# Altium PCB GTV4.0-V16_Lite.PcbDoc (part 7 of 7)
Units mil, origin at the board's own origin, x right, y up, seen from the top; angles counter-clockwise.
Board outline 5582.68 x 4389.76 mil, 4 copper layers (Top Layer, Layer 1, Layer 2, Bottom Layer), stack 62.631 mil thick; 269 components, 191 nets, 849 pads, 375 vias.
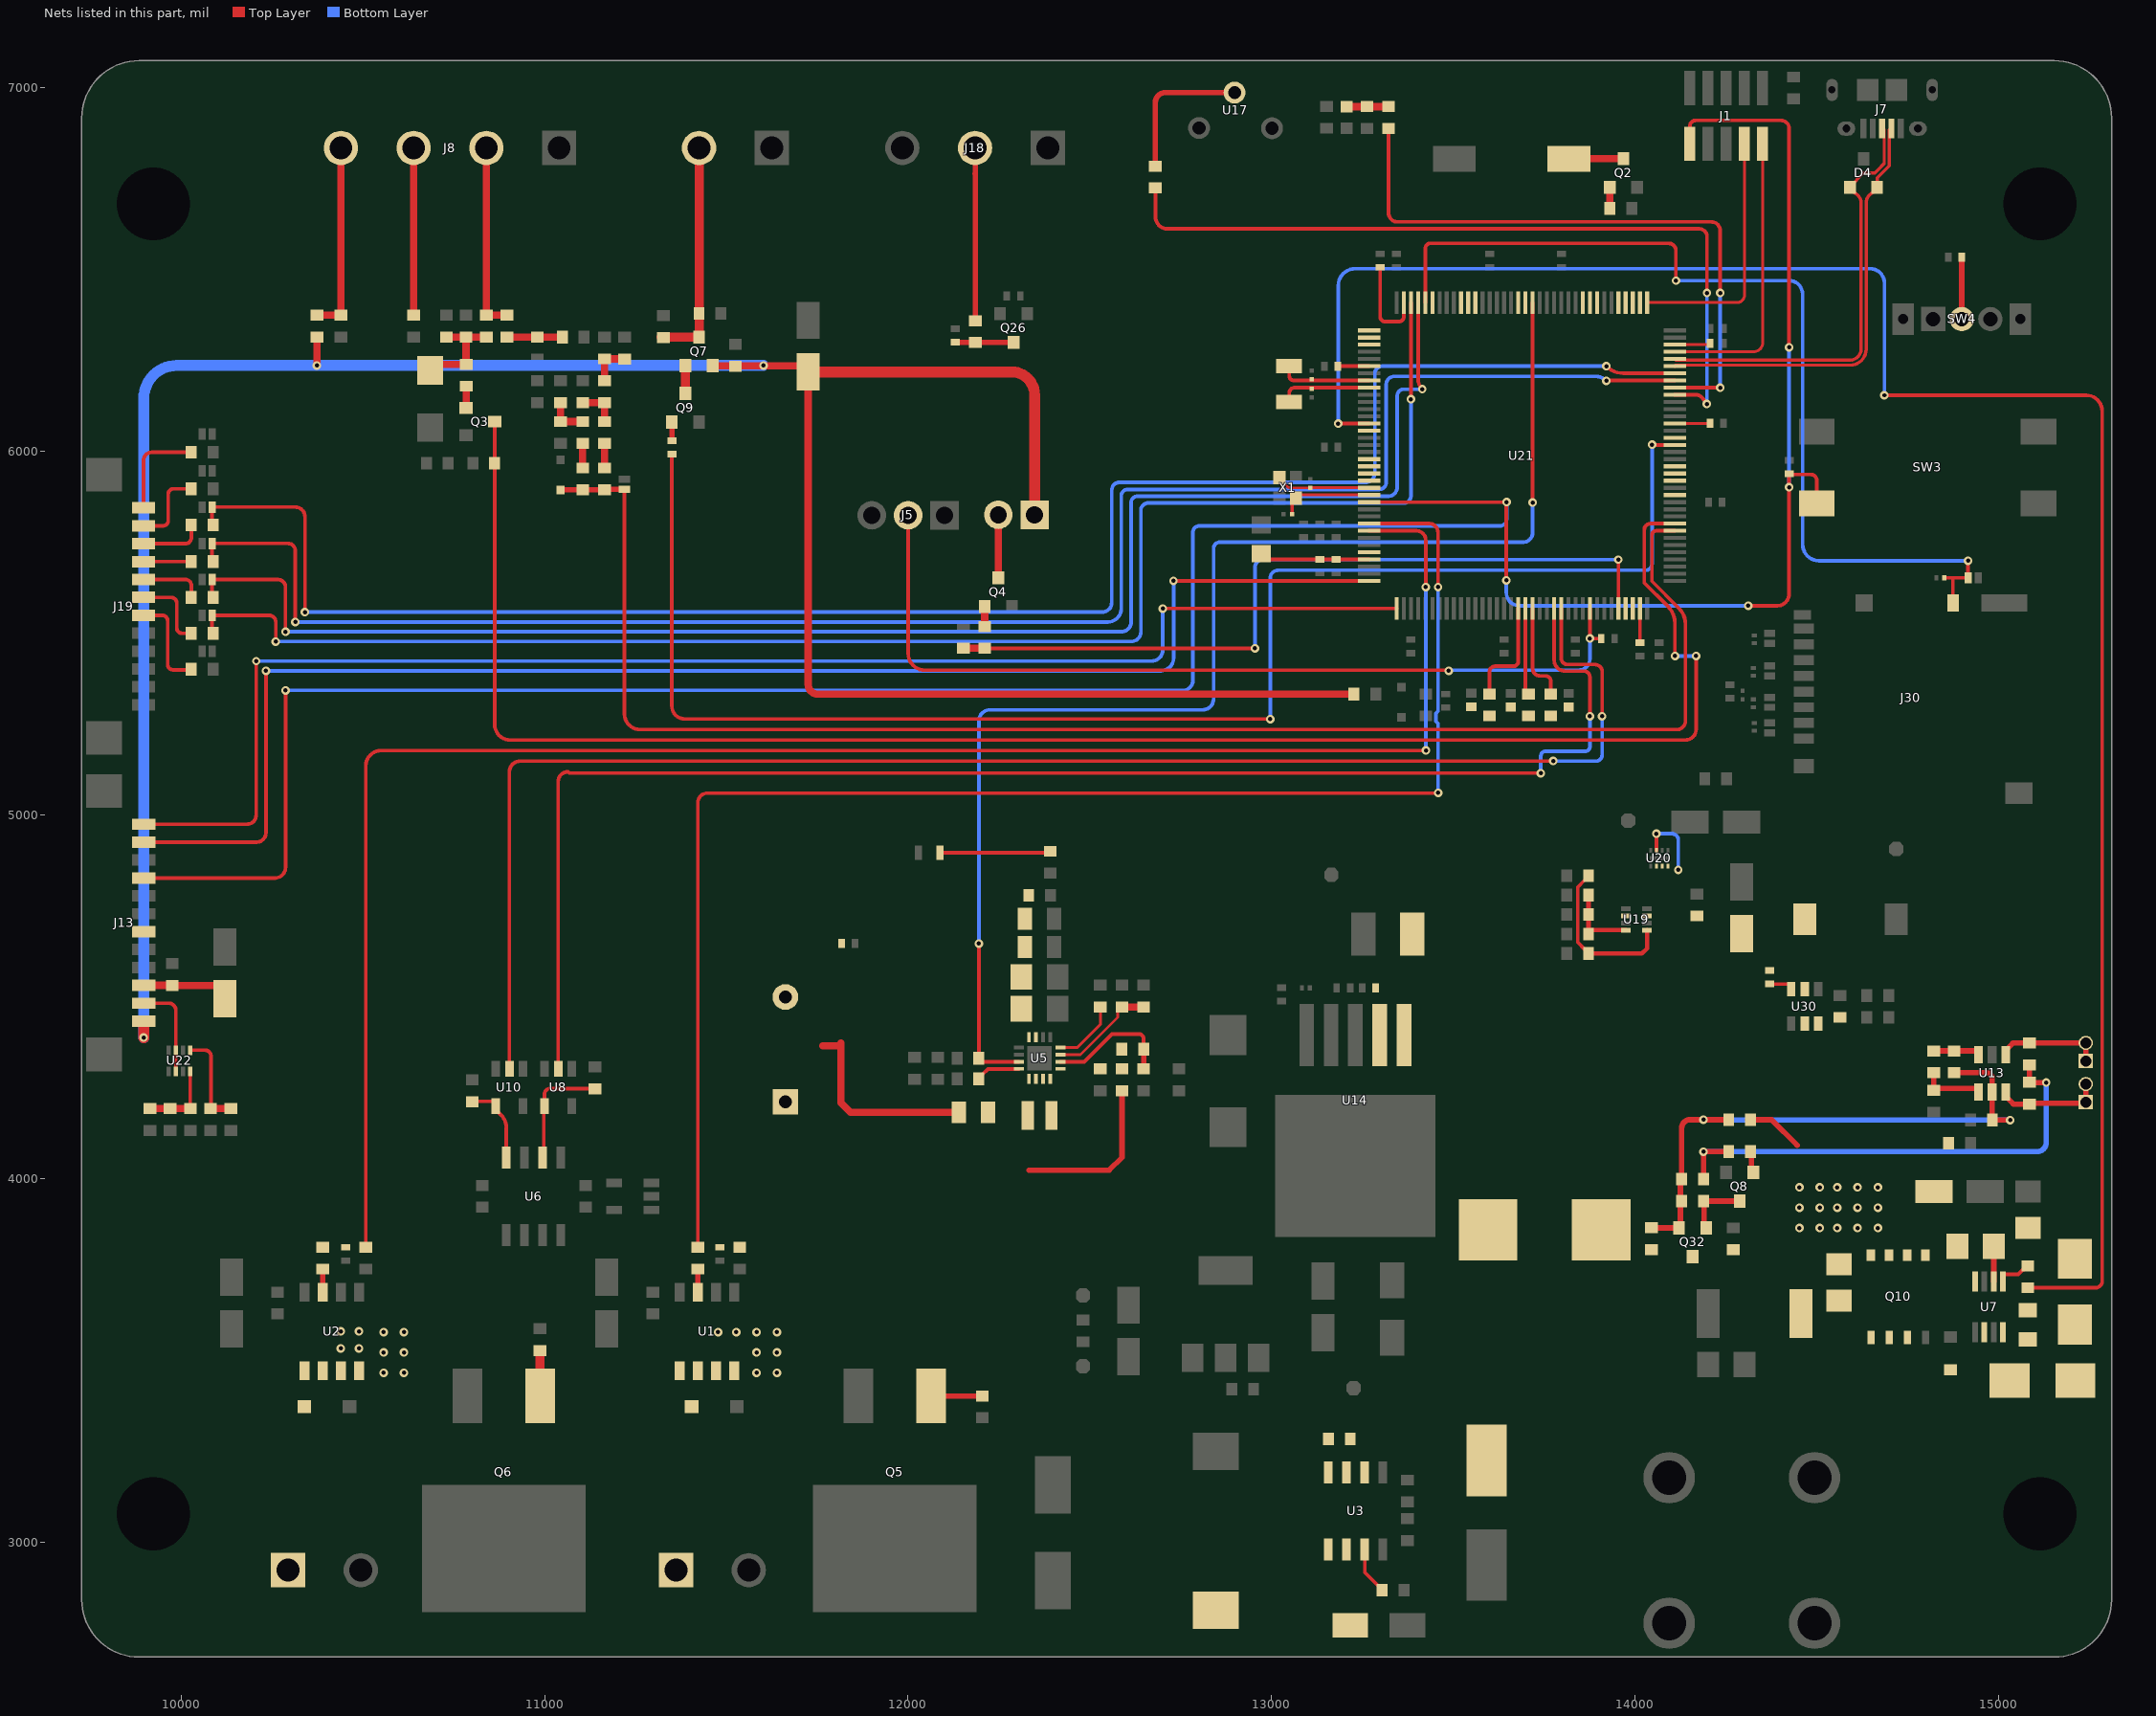
[diagram p5: the nets of this part, all layers, seen from the top]

## Via types
v1: diameter 23.62, hole 11.81, Top Layer to Bottom Layer, tented both sides, 375 vias

## Nets (pads, with @x,y where several pads share a name; then routed paths per layer and width w, separated by ;. In a path a pad name is that pad's centre, name@x,y a point inside that pad or via, vN(x,y) a via of type N, cw(c..) or ccw(c..) an arc to the next point about the centre after c; other vN are vias at no path point) (continued)
GSM_PWR_EN: D26.2 R101.1 U21.141 | length 4384.4
  Top Layer w10: R101.1@10088.56,5599.05 cw(c10088.56,5602.05) 10085.56,5602.05 D26.2@10085.56,5648.02 10267.2,5648.02 cw(c10267.2,5627.66) 10287.56,5627.66 v1(10287.56,5504.64) ; U21.141@13402.57,6409.47 13402.57,6199.1 ccw(c13441.57,6199.1) 13411.38,6174.4 ccw(c13441.57,6199.1) v1(13413.99,6171.52)
  Bottom Layer w10: v1(10287.56,5504.64) 12586.25,5504.64 ccw(c12586.25,5531.58) 12613.19,5531.58 12613.19,5859.57 cw(c12631.29,5859.57) 12631.29,5877.67 13320.91,5877.67 ccw(c13320.91,5901.88) 13345.12,5901.88 13345.12,6153.96 cw(c13362.68,6153.96) 13362.68,6171.52 v1(13413.99,6171.52)
GSM_RST: D27.2 R102.1 U21.142 | length 4315.7
  Top Layer w10: R102.1@10088.56,5500.51 cw(c10088.56,5503.51) 10085.56,5503.51 D27.2@10085.56,5549.6 10242.72,5549.6 cw(c10242.72,5531.58) 10260.75,5531.58 v1(10260.75,5477.71) ; v1@13382.88,6149.27 U21.142@13382.88,6409.47
  Bottom Layer w10: v1(10260.75,5477.71) 12613.19,5477.71 ccw(c12613.19,5504.64) 12640.12,5504.64 12640.12,5838.6 cw(c12660.33,5838.6) 12660.33,5858.8 13364.02,5858.8 ccw(c13364.02,5877.67) 13382.88,5877.67 v1(13382.88,6144.27) v1@13382.88,6149.27
HC_PWR: U21.117
HC_SET_O: J13.7
HEAT_1_CNTRL: R18.1 U21.92 | length 4209.1
  Top Layer w10: R18.1@11350,5993 11350,5300.75 ccw(c11386.13,5300.75) 11386.13,5264.61 v1(12996,5264.61) ; v1(14046,6019) ccw(c14047.14,6020.14) 14047.14,6018.53 U21.92@14108.47,6018.53
  Bottom Layer w10: v1(12996,5264.61) 12996,5652.08 cw(c13017.92,5652.08) 13017.92,5674 14028.81,5674 ccw(c14028.81,5691.19) 14046,5691.19 v1(14046,6019)
HEAT_CNTRL: U21.93
HEATER_1: C10.2 J6.2 Q7.3 R19.2 | length 625
  Top Layer w25: C10.2@11320,6315 Q7.3@11425,6315 R19.2@11425,6380 J6.2@11425,6835
IN+: R11.2 R30.1 U13.3 | length 122.8
  Top Layer w15: R30.1@14820.92,4351.92 U13.3@14943.74,4351.92
IN-: R30.2 R65.2 U13.4 | length 166
  Top Layer w15: R30.2@14820.92,4291.92 14820.92,4248.77 U13.4@14943.74,4248.77
INA_1: U8.2 U21.59 | length 4164.4
  Top Layer w10: U8.2@11037.46,4302.36 11037.46,5092.68 cw(c11064.43,5092.68) 11064.43,5119.65 11068.07,5116 v1(13740,5116) ; U21.59@13776.58,5568.53 13776.58,5427.22 ccw(c13807.31,5427.22) 13807.31,5396.5 13858.81,5396.5 cw(c13858.81,5380.3) 13875.01,5380.3 v1(13875.01,5272.08)
  Bottom Layer w10: v1(13740,5116) 13740,5163 cw(c13753,5163) 13753,5176 13862,5176 ccw(c13862,5189) 13875,5189 v1(13875.01,5272.08)
INA_1#: R46.2 U6.2 U8.4 | length 324.5
  Top Layer w10: U6.2@10995,4058.3 10998.03,4061.33 10998.03,4197.96 U8.4@11000.06,4199.99 11000.06,4233.36 cw(c11014.7,4233.36) 11014.7,4248 R46.2@11139,4248
INB_1: U10.2 U21.60 | length 4348.2
  Top Layer w10: U10.2@10903.4,4302.36 10903.4,5119.43 cw(c10932.97,5119.43) 10932.97,5149 v1(13774,5149) ; U21.60@13796.27,5568.53 13796.27,5431.65 ccw(c13813.35,5431.65) 13813.35,5414.56 13888.47,5414.56 cw(c13888.47,5394.17) 13908.87,5394.17 13908.87,5389.55 13908.63,5389.55 v1(13908.63,5272.08)
  Bottom Layer w10: v1(13774,5149) 13891.63,5149 ccw(c13891.63,5166) 13908.63,5166 v1(13908.63,5272.08)
INB_1#: R47.2 U6.4 U10.4 | length 229.3
  Top Layer w10: R47.2@10801,4221.18 10808.66,4213.51 10859.19,4213.51 10866,4206.7 10866,4190.16 10880.5,4175.66 cw(c10845.49,4140.65) 10895,4140.65 U6.4@10895,4058.3
IO_A11: R15.2 U21.55 | length 240.2
  Top Layer w10: U21.55@13697.84,5568.53 13697.84,5341.96 ccw(c13706.5,5341.96) R15.2@13706.5,5333.3
IO_A12: R17.2 U21.54 | length 302.2
  Top Layer w10: R17.2@13598.69,5333.3 13598.69,5393.91 cw(c13614.7,5393.91) 13614.7,5409.92 13664.98,5409.92 ccw(c13664.98,5423.1) 13678.16,5423.1 U21.54@13678.16,5568.53
IO_C9: U21.15
IO_C13: R14.2 U21.56 | length 270.3
  Top Layer w10: U21.56@13717.53,5568.53 13717.53,5402.98 ccw(c13737.21,5402.98) 13737.21,5383.3 13752.51,5383.3 cw(c13752.51,5368.28) 13767.53,5368.28 R14.2@13767.53,5333.3
IP+_1: D9.2 J3.1 U1.1 U1.2
IP+_2: D10.2 J4.1 U2.1 U2.2
"IPK SNS": R2.2 U3.1 U3.7 U3.8
IRQ_NFC: U21.139
LED_DIN: J18.2 R75.2 | length 476.6
  Top Layer w15: 12184,6764.2 cw(c12184,6763.2) 12185,6763.2 ; R75.2@12185,6360 12185,6763.2 ; J18.2@12185,6835 12185,6763.2
LEVEL_MCU: U21.85
MCU_RX: D19.2 R99.1 U21.102 | length 4992.7
  Top Layer w10: R99.1@10088.56,5798.14 cw(c10088.56,5801.14) 10085.56,5801.14 D19.2@10085.56,5847.57 10314.41,5847.57 cw(c10314.41,5820.8) 10341.18,5820.8 v1(10341.18,5558.51) ; v1@13920.02,6235.05 ccw(c13967.53,6282.59) 13967.53,6215.38 U21.102@14108.47,6215.38
  Bottom Layer w10: v1(10341.18,5558.51) 12533.51,5558.51 ccw(c12533.51,5585) 12560,5585 12560,5894.14 cw(c12581.31,5894.14) 12581.31,5915.45 13257.33,5915.45 ccw(c13257.33,5941.58) 13283.46,5941.58 13283.46,6214.09 cw(c13304.44,6214.09) 13304.44,6235.06 v1(13920,6235.06)
MCU_TX: D25.2 R100.1 U21.101 | length 4920.2
  Top Layer w10: R100.1@10088.56,5697.6 cw(c10088.56,5700.6) 10085.56,5700.6 D25.2@10085.56,5747.57 10294.43,5747.57 cw(c10294.43,5727.63) 10314.37,5727.63 v1(10314.37,5531.58) ; v1(13920,6195) 13920,6195.69 U21.101@14108.47,6195.69
  Bottom Layer w10: v1(10314.37,5531.58) 12549.3,5531.58 ccw(c12549.3,5568.53) 12586.25,5568.53 12586.25,5878.42 cw(c12603.86,5878.42) 12603.86,5896.02 13295.57,5896.02 ccw(c13295.57,5915.45) 13315,5915.45 13315,6185 cw(c13337,6185) 13337,6207 13891.03,6207 cw(c13891.03,6166.03) v1(13920,6195)
MEM_CNTRL: U21.3
MicroSD_DET: D24.2 J30.SW-A R160.1 U21.140 | length 2659.9
  Top Layer w10: U21.140@13422.25,6409.47 13422.25,6558.62 cw(c13436.43,6558.62) 13436.43,6572.79 14091.5,6572.79 cw(c14091.5,6552.79) 14111.5,6552.79 v1(14111.5,6470.16) ; R160.1@14849.65,5653 14873.48,5653 ; J30.SW-A@14873.48,5584.42 14873.48,5653 ; v1(14915,5700) D24.2@14915,5653 14873.48,5653
  Bottom Layer w10: v1(14111.5,6470.16) 14423,6470.16 ; 14423.05,6470.16 cw(c14423,6433.16) 14460,6433.16 14460,5745.05 ccw(c14505.05,5745.05) 14505.05,5700 v1(14915,5700)
MISO_NFC: U21.134
MODE1: R129.2 R130.2 U19.5 | length 456.7
  Top Layer w10: R130.2@13871.25,4620 13871.25,4622.5 13862.25,4631.5 13860.88,4631.5 13841.46,4650.92 13841.46,4802.5 13861.46,4822.5 13862.25,4822.5 13871.25,4831.5 R129.2@13871.25,4834
  Top Layer w12: R130.2@13871.25,4620 14018.4,4620 14032.19,4633.79 U19.5@14032.19,4683.93
MODE2: R134.2 R135.2 U22.5 | length 266.5
  Top Layer w10: U22.5@10025.39,4353.98 10065.95,4353.98 cw(c10065.95,4337.08) 10082.86,4337.08 10082.86,4193.19 R135.2@10081.5,4193.19
  Top Layer w20: R135.2@10082.86,4193.19 R134.2@10137,4193.19
MOSI_NFC: U21.135
NetC5_1: C5.1 R23.1 R26.1 | length 113.4
  Top Layer w20: R23.1@11044,6135 C5.1@11044,6082.6 R26.1@11105,6082.6
NetC8_2: C8.2 R29.2 R33.1 | length 112.4
  Top Layer w20: C8.2@11105,6135 R29.2@11165,6135 R33.1@11165,6082.6
NetC20_2: C20.2 U3.3 | length 131.8
  Top Layer w10: U3.3@13256,2980.55 13256,2917.99 13292.49,2881.5 13293.48,2881.5 13303.48,2871.5 C20.2@13303.48,2869
NetC67_2: C67.2 C68.1 U19.2 U19.7 U20.3 U20.6 U20.7 U20.8 | length 198.1
  Top Layer w10: U20.3@14057.81,4903.51 v1(14057.81,4949.5)
  Bottom Layer w10: v1(14057.81,4949.5) 14100.5,4949.5 cw(c14100.5,4931.99) 14118.01,4931.99 v1(14118.01,4850.07)
NetC69_2: C69.2 C76.1 J13.10 J13.11 U22.2 U22.7 | length 510.9
  Top Layer w10: J13.11@9897.63,4483.11 9966.33,4483.11 cw(c9966.33,4463.43) 9986.02,4463.43 U22.7@9986.02,4353.98 U22.2@9986.02,4296.11
  Top Layer w20: J13.10@9897.63,4532.32 9975.68,4532.32 C69.2@9976,4532 10094.5,4532 10121,4505.5 C76.1@10121,4496
NetC75_1: C75.1 L3.1 U30.5
NetC75_2: C75.2 U30.6 | length 70.1
  Top Layer w10: C75.2@14369,4536.49 14369.93,4535.56 14421.79,4535.56 14428.6,4528.75 U30.6@14428.6,4521.49
NetC115_1: C115.1 C116.2 L7.1 R136.2 U5.5 | length 453.6
  Top Layer w15: 12332.37,4024.12 12553.12,4024.12 12587.99,4058.99 R136.2@12587.99,4242.49
NetC122_2: C122.2 R136.1 R164.2 U5.9
NetC131_2: C131.2 U21.71 | length 93.6
  Top Layer w10: C131.2@14012.73,5475.04 14012.73,5568.53 U21.71@14012.8,5568.53
NetC132_2: C132.2 U21.106 | length 96
  Top Layer w8: U21.106@14108.47,6294.12 C132.2@14204.5,6294.12
NetD1_1: D1.1 L2.1 U3.2
NetD6_1: D6.1 D7.1
NetJ8_2: J8.2 SB3.1 SB5.1 | length 516.8
  Top Layer w20: J8.2@10840,6835 SB3.1@10840,6375 SB5.1@10896.81,6375
NetJ8_3: J8.3 R35.2 | length 460
  Top Layer w20: R35.2@10640,6375 J8.3@10640,6835
NetJ19_1: J19.1 R97.2 | length 274.8
  Top Layer w10: J19.1@9896.89,5845.24 9896.89,5975.12 cw(c9920,5975.12) 9920,5998.23 R97.2@10028.56,5998.23
NetJ19_2: J19.2 R98.2 | length 221.3
  Top Layer w10: J19.2@9896.89,5796.02 9951.22,5796.02 ccw(c9951.22,5809.8) 9965,5809.8 9965,5883.43 cw(c9979.26,5883.43) 9979.26,5897.69 R98.2@10028.56,5897.69
NetJ19_3: J19.3 R99.2 | length 175.9
  Top Layer w10: J19.3@9896.89,5746.81 10012.05,5746.81 ccw(c10012.05,5763.32) 10028.56,5763.32 R99.2@10028.56,5798.14
NetJ19_4: J19.4 R100.2 | length 131.7
  Top Layer w10: J19.4@9896.89,5697.6 R100.2@10028.56,5697.6
NetJ19_5: J19.5 R101.2 | length 174.1
  Top Layer w10: J19.5@9896.89,5648.39 10012.45,5648.39 cw(c10012.45,5632.27) 10028.56,5632.27 R101.2@10028.56,5599.05
NetJ19_6: J19.6 R102.2 | length 217.4
  Top Layer w10: J19.6@9896.89,5599.17 9972,5599.17 cw(c9972,5582.37) 9988.8,5582.37 9988.8,5513.87 ccw(c10002.17,5513.87) 10002.17,5500.51 R102.2@10028.56,5500.51
NetJ19_7: J19.7 R103.2 | length 270.2
  Top Layer w10: J19.7@9896.89,5549.96 9948.53,5549.96 cw(c9948.53,5535.15) 9963.34,5535.15 9963.34,5414.46 ccw(c9977.8,5414.46) 9977.8,5400 10026.6,5400 ccw(c10026.6,5401.96) R103.2@10028.56,5401.96
NetL7_2: L7.2 U5.6 U5.7 U5.8
NetLED1_2: LED1.2 R14.1
NetLED2_2: LED2.2 R15.1
NetLED3_2: LED3.2 R17.1
NetLED4_2: LED4.2 R4.1 SB1.2 | length 115.5
  Top Layer w12: SB1.2@13321,6948.46 SB1.2@13321,6948.93
  Top Layer w20: LED4.2@13206,6948.46 SB1.2@13321,6948.46
NetLED11_1: LED11.1 R132.1 | length 303.9
  Top Layer w10: LED11.1@12087.06,4897 R132.1@12391,4897
NetLS1_2: LS1.2 Q2.3 | length 150.5
  Top Layer w20: LS1.2@13817.06,6805.61 Q2.3@13967.58,6805.61
NetQ2_1: Q2.1 R6.2 | length 57.9
  Top Layer w20: R6.2@13930.18,6669 Q2.1@13930.18,6726.87
NetQ3_1: Q3.1 R22.2 | length 60.6
  Top Layer w15: Q3.1@10783.95,6120 ccw(c10783.95,6121.05) Q3.1@10785,6121.05
  Top Layer w20: Q3.1@10785,6121.05 R22.2@10785,6180
NetQ4_1: Q4.1 R124.2 | length 54.9
  Top Layer w20: R124.2@12210.6,5519.36 Q4.1@12210.6,5574.26
NetQ5_1: Q5.1 R24.2 | length 140.4
  Top Layer w15: Q5.1@12063.57,3403.08 R24.2@12204,3403.08
NetQ6_1: Q6.1 R25.2 | length 124.9
  Top Layer w25: Q6.1@10987.57,3403.08 R25.2@10987.57,3528
NetQ7_1: Q7.1 Q9.3 | length 76.3
  Top Layer w25: Q9.3@11387.6,6160 Q7.1@11387.6,6236.26
NetQ8_1: Q8.1 R69.1 | length 60.2
  Top Layer w15: R69.1@14316.9,4075 14319.58,4072.33 14319.58,4022.55 Q8.1@14324.3,4017.82
NetQ8_3: Q8.3 Q32.1 R68.1 | length 176.5
  Top Layer w15: Q32.1@14194.8,3865.15 14189.41,3870.55 14189.41,3937.07 R68.1@14187.4,3939.08 14194.8,3939.08 Q8.3@14286.9,3939.08
NetQ9_1: Q9.1 R18.2 | length 51.5
  Top Layer w10: R18.2@11350,6030 R18.2@11350.2,6030
  Top Layer w15: R18.2@11350.2,6030 Q9.1@11350.2,6081.26
NetQ26_3: Q26.3 R74.2 R75.1 | length 160
  Top Layer w15: R74.2@12130,6300.63 Q26.3@12290,6300.63
NetR5_1: R5.1 U1.7 | length 63.5
  Top Layer w15: U1.7@11421.56,3688.54 R5.1@11421.56,3752
NetR8_1: R8.1 U2.7 | length 63.5
  Top Layer w15: U2.7@10389.56,3688.54 R8.1@10389.56,3752
NetR9_2: R9.2 U17.2 | length 409.6
  Top Layer w10: R9.2@12680,6780 ccw(c12680,6780.8) R9.2@12680.8,6780.8
  Top Layer w15: R9.2@12680,6785 12680,6960 cw(c12707.3,6960) 12707.3,6987.3 U17.2@12897.8,6987.3
NetR16_2: R16.2 SW4.2 | length 169.6
  Top Layer w15: SW4.2@14897.77,6364.45 R16.2@14897.77,6534
NetR26_2: R26.2 SB4.2 | length 67.6
  Top Layer w20: SB4.2@11105,5955 R26.2@11105,6022.6
NetR27_1: R27.1 R28.1 R29.1 | length 115.6
  Top Layer w20: R29.1@11165,6195 R27.1@11165,6255 11220,6255 R28.1@11220,6254.37
NetR33_2: R33.2 SB13.2 | length 67.6
  Top Layer w20: SB13.2@11165,5955 R33.2@11165,6022.6
NetR55_2: R55.2 U21.6 | length 85.7
  Top Layer w10: R55.2@13182,6235.21 13267.53,6235.21 U21.6@13267.53,6235.06
NetR104_2: R104.2 U21.95 | length 97
  Top Layer w8: U21.95@14108.47,6077.58 R104.2@14205.5,6077.58
NetR105_1: R105.1 U21.143 | length 254.4
  Top Layer w10: R105.1@13298.24,6507 13298.24,6371.17 ccw(c13311.63,6371.17) 13311.63,6357.78 13349.87,6357.78 ccw(c13349.87,6371.11) 13363.2,6371.11 U21.143@13363.2,6409.47
NetR109_1: R109.1 R165.2 U5.11 | length 296
  Top Layer w8: U5.11@12418.58,4341.86 12474.01,4341.86 12576.64,4444.5 12576.64,4462.01 12587.64,4473.01 R165.2@12587.99,4473.01
  Top Layer w20: R165.2@12585.49,4473.01 R109.1@12647.49,4473.01
NetR125_1: R125.1 R126.2 R133.1 U19.4 | length 215.2
  Top Layer w12: R133.1@13871.25,4780.5 R126.2@13871.25,4727 R125.1@13871.25,4673.5 13871.25,4674.93 13880.25,4683.93 U19.4@13974.32,4683.93
NetR127_1: R127.1 R128.2 R137.1 U22.4 | length 213.9
  Top Layer w10: U22.4@10025.39,4296.11 10025.39,4193.19 R127.1@10026,4193.19
  Top Layer w20: R137.1@9915,4193.19 R128.2@9970.5,4193.19 R127.1@10025.39,4193.19
NetR163_1: R163.1 U5.4 | length 120.6
  Top Layer w10: R163.1@12194.49,4277.09 12194.49,4277.43 12204.49,4287.43 12204.83,4287.43 12219.89,4302.49 U5.4@12304.41,4302.49
NetR164_1: R164.1 R166.2 U5.10 | length 351.1
  Top Layer w10: U5.10@12418.58,4322.17 12484.43,4322.17 12560.84,4398.58 12634.5,4398.58 cw(c12634.5,4385.59) 12647.49,4385.59 12647.49,4357.62 R164.1@12647.99,4357.12
  Top Layer w15: R166.2@12647.74,4302.74 R164.1@12647.74,4356.87
  Top Layer w20: R166.2@12647.49,4302.49 R166.2@12647.74,4302.74
NetR167_2: R167.2 U5.12 | length 184.5
  Top Layer w8: U5.12@12418.58,4361.54 12465.56,4361.54 12528.49,4424.47 R167.2@12528.49,4473.01
NetSB7_2: SB7.2 U7.5 | length 97.4
  Top Layer w10: U7.5@15011.34,3717.68 15011.34,3737.33 15053.29,3737.33 15066.59,3750.64 15069.46,3750.64 SB7.2@15079.46,3760.64
NRST: C73.2 J1.10 J13.4 SW3.3 U21.25 | length 7995.4
  Top Layer w10: J13.4@9897.62,4827.6 10258.85,4827.6 ccw(c10258.85,4856.56) 10287.81,4856.56 v1(10287.81,5343.53) ; U21.25@13267.53,5861.05 v1(13646.05,5861.05) ccw(c13646.05,5860) 13645,5860 v1(13645,5646) ; J1.10@14150,6846.46 14150,6894.93 cw(c14165.84,6894.93) 14165.84,6910.77 14400.65,6910.77 cw(c14400.65,6888.42) 14423,6888.42 v1(14423,6287) ; v1(14310.51,5576) 14390,5576 ccw(c14390,5609) 14423,5609 v1(14423,5902.04) 14423,5937 C73.2@14423,5938.93 ccw(c14424.93,5938.93) 14424.93,5937 14482.86,5937 cw(c14482.86,5920.86) 14499,5920.86 SW3.3@14499,5858
  Bottom Layer w10: v1(10287.81,5343.53) 12756.28,5343.53 ccw(c12756.28,5370.34) 12783.09,5370.34 12783.09,5777.68 cw(c12801.04,5777.68) 12801.04,5795.64 13627.7,5795.64 ccw(c13627.7,5813.98) 13646.05,5813.98 v1@13646.05,5860.16 ; v1(13645,5646) 13645,5613 ccw(c13682,5613) 13682,5576 v1(14310.51,5576) ; v1(14423,5902.04) v1(14423,6287)
OSC_IN: C133.2 U21.8 X3.2 | length 253.5
  Top Layer w10: X3.2@13048,6235.21 13048,6208.63 ccw(c13060.94,6208.63) 13060.94,6195.69 13110,6195.69 U21.8@13267.53,6195.69
OSC_OUT: C134.2 U21.9 X3.1 | length 252.1
  Top Layer w10: X3.1@13048,6136.79 13048,6151.47 13048,6160.52 cw(c13063.49,6160.52) 13063.49,6176.01 13110,6176.01 U21.9@13267.53,6176.01
OV_UV_EN: R66.2 R67.2 R69.2 R70.1 | length 1352.2
  Top Layer w15: R70.1@14187.4,3999.71 v1(14187.4,4075) ; v1@14196.19,4075 R69.2@14256.9,4075 ; R66.2@15083.92,4313.6 R67.2@15083.92,4265.77 ccw(c15084.69,4265.77) 15084.69,4265 v1(15130,4265)
  Bottom Layer w15: v1(14187.4,4075) 15105,4075 ccw(c15105,4100) 15130,4100 v1(15130,4265)
PGND: C115.2 C116.1 C117.1 C118.1 C119.1 C120.1 C121.1 NT1.1 U5.15 U5.16 | length 537.6
  Top Layer w20: 11765.35,4366.45 11803.48,4366.45 ; 11815.2,4373.51 11815.2,4209.21 11841.48,4182.93 C116.1@12139.49,4182.93
PIR_OUT: R9.1 U21.99 | length 2186.6
  Top Layer w10: R9.1@12680,6725 12680,6646.31 ccw(c12713.64,6646.31) 12713.64,6612.67 14175.64,6612.67 cw(c14175.64,6591.31) 14197,6591.31 v1(14197,6436) ; U21.99@14108.47,6156.32 14165.69,6156.32 cw(c14165.69,6131.13) 14186.29,6145.63 v1(14196.5,6131.13)
  Bottom Layer w10: v1(14196.5,6131.13) 14196.75,6131.38 14196.75,6435.75 v1(14197,6436)
PM_CNTRL: U21.2
PS_IN: SB2.1 SB5.2 SB6.1 | length 152.2
  Top Layer w20: SB5.2@10896.81,6315 10990,6315 10990,6315.12 SB6.1@11048.94,6315.12
PS_MCU: D3.2 D12.2 SB4.1 SB13.1 U21.80 | length 4366.7
  Top Layer w10: SB13.1@11165,5895 cw(c11166.22,5895) SB13.1@11166.22,5896.22 ; D3.2@11220,5896.22 11220,5278.26 ccw(c11262.55,5278.26) 11262.55,5235.71 14114.49,5235.71 ccw(c14114.49,5259.03) 14137.81,5259.03 14137.81,5526.15 ccw(c14077.34,5526.15) 14120.1,5568.9 14045.45,5643.55 14045.45,5769.91 cw(c14057.84,5769.91) 14057.84,5782.31 U21.80@14108.47,5782.31
  Top Layer w15: D12.2@11044,5895 SB4.1@11105,5895 SB13.1@11165,5895 ; SB13.1@11166.22,5896.22 D3.2@11220,5896.22
PS_PWR: J8.4 SB8.1 SB10.1 | length 526.1
  Top Layer w20: SB10.1@10373.91,6375 SB8.1@10440,6375 J8.4@10440,6835
PSW_MCU: C37.1 D8.1 R22.1 R43.1 SB3.2 | length 294.9
  Top Layer w15: R22.1@10783.95,6241.05 ccw(c10785,6241.05) R22.1@10785,6240
  Top Layer w20: D8.1@10685,6223.74 cw(c10701.26,6223.74) 10701.26,6240 R22.1@10785,6240 ; C37.1@10730,6315 SB3.2@10840,6315 ; R22.1@10783.95,6241.05 R43.1@10783.95,6315
PWM_D2: Q3.3 R20.2 U21.81 | length 4910.8
  Top Layer w10: Q3.3@10862.69,6082.6 R20.2@10862.69,5968 10862.69,5250 ccw(c10905.89,5250) 10905.89,5206.81 14137.81,5206.81 ccw(c14137.81,5236) 14167,5236 v1(14167,5438.04) ; U21.81@14108.47,5801.99 14041.65,5801.99 ccw(c14041.65,5785.04) 14024.7,5785.04 14024.7,5639.53 14089.61,5574.62 cw(c14042.81,5527.82) 14109,5527.82 v1(14109,5438.04)
  Bottom Layer w10: v1(14109,5438.04) v1(14167,5438.04)
RE/DE/RS485/T: U21.88
READY: R161.1 U5.3 U21.125 | length 3669.8
  Top Layer w10: v1(12194.49,4647) R161.1@12194.49,4332.01 12204.33,4322.17 U5.3@12304.41,4322.17 ; v1(13717.39,5860.15) 13717.46,5860.22 13717.46,6409.4 U21.125@13717.53,6409.47
  Bottom Layer w10: v1(12194.49,4647) 12194.49,5259.03 cw(c12225.36,5259.03) 12225.36,5289.9 12809.91,5289.9 ccw(c12809.91,5320) 12840,5320 12840,5733.43 cw(c12857.69,5733.43) 12857.69,5751.12 13692.21,5751.12 ccw(c13692.21,5776.3) 13717.39,5776.3 v1(13717.39,5860.15)
RS_CNTRL: U21.1
RX: U21.116
RX_AUX: U21.126
RXD/RS485/RS232/T: U21.87
RXIN1: U21.70
RXIN2: U21.112
SCK_NFC: U21.133
SET: U21.118
SHDN: R32.1 SB7.1 U21.14 | length 5555.6
  Top Layer w10: v1(13182.91,6077) 13182.91,6077.58 U21.14@13267.53,6077.58 ; v1(14685,6155) 15240,6155 cw(c15240,6111) 15284,6111 15284,3719 cw(c15265.64,3719) 15265.64,3700.64 SB7.1@15079.46,3700.64
  Bottom Layer w10: v1(13182.91,6077) 13182.91,6456.37 cw(c13229.54,6456.37) 13229.54,6503 14645.93,6503 cw(c14645.93,6463.93) 14685,6463.93 v1(14685,6155)
SNS_IN: SB1.1 U21.100 | length 1729.1
  Top Layer w10: SB1.1@13321,6888.93 13321,6657.88 ccw(c13348.02,6657.88) 13338.28,6632.67 ccw(c13341.89,6642) 13341.84,6632 14208.34,6632 cw(c14208.34,6606.84) 14233.5,6606.84 v1(14233.5,6436) ; U21.100@14108.47,6176.01 v1(14233.5,6176.01)
  Bottom Layer w10: v1(14233.5,6176.01) v1(14233.5,6436)
SR_BR_CS: U21.22
SR_BR_MISO: U21.20
SR_BR_MOSI: U21.21
SR_BR_SCK: U21.19
SS_NFC: U21.110
SWCLK: J1.4 U21.109 | length 695.9
  Top Layer w8: U21.109@14032.49,6409.47 14032.49,6410 14280,6410 ccw(c14280,6430) 14300,6430 J1.4@14300,6846.46
SWDIO: J1.2 U21.105 | length 802.8
  Top Layer w8: U21.105@14108.47,6274.43 14325,6274.43 ccw(c14325,6299.43) 14350,6299.43 J1.2@14350,6846.46
TEMP_SNS: J5.2 R31.2 U21.64 | length 2469.8
  Top Layer w10: J5.2@12000,5825 12000,5445 ccw(c12046,5445) 12046,5399 13485.29,5399 v1(13486.82,5397.47) ; U21.64@13875.01,5568.53 v1(13875.01,5486.09) R31.2@13906.02,5486.09
  Bottom Layer w10: v1(13486.82,5397.47) 13488.35,5399 13844,5399 ccw(c13844,5430) 13875,5430 v1(13875.01,5486.09)
TX: U21.113
TX_AUX: U21.127
TXD/RS485/RS232/T: U21.89
TXIN1: U21.69
TXIN2: U21.111
USB_D_N: D4.2 J7.2 U21.103 | length 1187.1
  Top Layer w9: U21.103@14108.47,6235.06 14111.31,6237.91 14280.57,6237.91 14286.28,6237.91 ccw(c14286.37,6251.91) 14286.37,6237.91 14591.01,6237.91 ccw(c14591.01,6281.56) 14634.66,6281.56 14634.66,6683.86 cw(c14665.06,6683.86) 14647.51,6708.68 14653.42,6712.86 D4.2@14665.06,6726.47 ; D4.2@14665.65,6727.06 14665.65,6753.33 14690.41,6778.09 14698.61,6786.29 14698.61,6882.63 cw(c14704.41,6882.63) J7.2@14704.41,6888.43
USB_D_P: D4.1 J7.3 U21.104 | length 1207.8
  Top Layer w9: U21.104@14108.47,6254.75 14111.31,6251.91 14591.01,6251.91 ccw(c14591.01,6281.56) 14620.66,6281.56 14620.66,6683.9 ccw(c14590.26,6683.9) 14599.51,6712.86 D4.1@14590.26,6726.47 ; D4.1@14590.26,6728.44 14627.66,6765.84 14658.37,6765.84 14666.81,6774.28 14684.61,6792.09 14684.61,6882.63 ccw(c14678.82,6882.63) J7.3@14678.82,6888.43
VCC: C24.1 C25.2 J10.1 J13.12 Q7.2 R12.2 SB10.2 | length 7263.6
  Top Layer w20: v1(10373.91,6237) SB10.2@10373.91,6315 ; Q7.2@11462.4,6236.26 C24.1@11725,6236.26 ; C24.1@11725,6219.13 11725,5359.6 ccw(c11751.3,5359.6) 11751.3,5333.3 R12.2@13226,5333.3
  Top Layer w30: v1(9897.63,4388.63) J13.12@9897.63,4433.9 ; C24.1@11725,6219.13 12284.87,6219.13 cw(c12284.87,6156) 12348,6156 J10.1@12348,5826.49
  Bottom Layer w30: v1(9897.63,4388.63) 9897.63,6145.79 cw(c9988.84,6145.79) 9988.84,6237 v1(10373.91,6237) v1(11602,6237)
VCC#12: D11.2 Q32.3 R34.2 SB11.1
VCC##12: C9.1 C77.2 C90.2 C91.1 D11.1 R2.1 U3.6 U14.1 U14.2 U30.2 U30.3
VCC#M: D6.2 D71.2 Q10.1 Q10.2 Q10.3 R32.2 R149.1 SB12.1 U7.2 U7.4
VCC#P: C1.1 C3.1 C50.2 Q10.5 Q10.6 Q10.7 Q10.8 SB9.2 SB12.2 U1.3 U1.4 U2.3 U2.4 U7.8 | length 164.6
  Top Layer w15: SB9.2@14309.47,4162.77 14374.73,4162.77 14445,4092.5
  other v1: 10557.28,3466.84 10613.28,3466.84 11583.28,3466.84 11639.28,3466.84 10557.28,3522.84 10613.28,3522.84 11583.28,3522.84 11639.28,3522.84 10439.56,3533.84 10489.56,3533.84 10557.28,3578.84 10613.28,3578.84 11477.28,3578.84 11527.28,3578.84 11583.28,3578.84 11639.28,3578.84 10439.56,3580.84 10489.56,3580.84 14451.15,3865 14507.15,3865 14555,3865 14611,3865 14667,3865 14451.15,3921 14507.15,3921 14555,3921 14611,3921 14667,3921 14451.15,3977 14507.15,3977 14555,3977 14611,3977 14667,3977
VCC_M: C53.1 Q32.2 R11.1 R68.2 R70.2 SB9.1 SB11.2 U13.5 | length 1606.5
  Top Layer w15: SB11.2@14053.37,3865.15 Q32.2@14120,3865.15 14123.9,3869.05 14123.9,3999.71 ccw(c14123.9,4003.21) 14127.4,4003.21 14127.4,4139.71 cw(c14150.46,4139.71) 14150.46,4162.77 v1(14187.4,4162.77) 14253.76,4162.77 SB9.1@14256.53,4160 ; R11.1@14876.83,4291.92 14966.49,4291.92 cw(c14966.49,4276.92) 14981.49,4276.92 C53.1@14981.49,4164.12 ; C53.1@14981.83,4161.77 v1(15030.75,4161.77)
  Bottom Layer w15: v1@14187.4,4161.77 v1(15030.75,4161.77)
VDDA: C7.1 C113.1 L1.2 U21.32 U21.33 | length 296.1
  Top Layer w10: L1.2@12971.42,5703.57 C7.1@13133,5703.57 C113.1@13177,5703.57 U21.33@13267.53,5703.57
VIOUT1: C11.1 R5.2 R7.1 U21.28 | length 4198.8
  Top Layer w10: R5.2@11421.56,3812 11421.56,5034.01 cw(c11448.55,5034.01) 11448.55,5061 13457,5061 v1(13458,5062) ; U21.28@13267.53,5801.99 13433.11,5801.99 cw(c13433.11,5777.7) 13457.4,5777.7 v1(13457.4,5627.61)
  Bottom Layer w10: v1(13457.4,5627.61) 13457.4,5286.11 13451.56,5280.27 13451.56,5258.06 13457.4,5252.22 13457.4,5062.6 v1(13458,5062)
VIOUT2: C19.1 R8.2 R10.1 U21.29 | length 5012.9
  Top Layer w10: R10.1@10508.56,3812 10508.56,5136.48 cw(c10549.98,5136.48) 10549.98,5177.9 13423.9,5177.9 v1(13424,5178) ; U21.29@13267.53,5782.31 13397.23,5782.31 cw(c13397.23,5755.76) 13423.78,5755.76 v1(13423.78,5627.61)
  Bottom Layer w10: v1(13423.78,5627.61) 13423.89,5627.5 13423.89,5178.11 v1(13424,5178)
VOUT_A: J14.1 J14.2 R66.1 U13.1 | length 290.6
  Top Layer w15: U13.1@15018.54,4341.92 15018.54,4353.73 15038.42,4373.6 R66.1@15083.92,4373.6 15084.08,4373.76 15238.76,4373.76 J14.2@15238.92,4373.92 J14.1@15238.92,4323.92
VOUT_B: J16.1 J16.2 R67.1 U13.6 | length 293
  Top Layer w15: U13.6@15018.54,4238.77 15018.54,4226.96 15039.73,4205.77 R67.1@15083.92,4205.77 15086.42,4208.27 15236.42,4208.27 J16.1@15238.92,4210.77 J16.2@15238.92,4260.77
VSS: C50.1 D7.2 R64.1 U7.6 | length 97.3
  Top Layer w15: U7.6@14985.75,3717.68 C50.1@14985.75,3815
W_LED: J10.2 Q4.3 | length 173.5
  Top Layer w20: Q4.3@12248,5653 J10.2@12248,5826.49
W_LED_CNTRL: R44.2 R124.1 U21.68 | length 2171.2
  Top Layer w10: R44.2@12152,5460 ccw(c12152.91,5460) R44.2@12152.91,5459.09 ; R124.1@12210.34,5459.09 v1@12954,5459.09 ; v1(13953,5703) 13953.37,5702.63 13953.37,5568.9 U21.68@13953.75,5568.53
  Top Layer w20: R44.2@12152.91,5459.09 R124.1@12210.34,5459.09
  Bottom Layer w10: v1(12954,5459) 12954,5681.85 cw(c12975.15,5681.85) 12975.15,5703 v1(13953,5703)
WIFI_RX1: J13.2 U21.36 | length 4063
  Top Layer w10: J13.2@9897.62,4926.02 10207.61,4926.02 ccw(c10207.61,4952.35) 10233.94,4952.35 v1(10233.94,5397.15) ; v1(12729.73,5644.97) 12729.96,5644.74 13267.3,5644.74 U21.36@13267.53,5644.51
  Bottom Layer w10: v1(10233.94,5397.15) 12694.77,5397.15 ccw(c12694.77,5432.38) 12730,5432.38 12730,5644.7 v1(12729.73,5644.97)
WIFI_TX1: J13.1 U21.37 | length 4014.8
  Top Layer w10: J13.1@9897.62,4975.24 10181.34,4975.24 ccw(c10181.34,5000.9) 10207,5000.9 v1(10207,5423.96) ; v1(12700.39,5568.53) U21.37@13343.51,5568.53
  Bottom Layer w10: v1(10207,5423.96) 12669.35,5423.96 ccw(c12669.35,5455) 12700.39,5455 v1(12700.39,5568.53)
XIN: C34.2 U21.24 X1.1 | length 252.6
  Top Layer w8: C34.2@13056.09,5828.32 13056.09,5861.46 X1.1@13066.54,5871.91 13075.36,5880.73 U21.24@13267.53,5880.73
XOUT: C35.2 U21.23 X1.3 | length 254.4
  Top Layer w7: X1.3@13027.63,5927.96 13034.5,5913.8 13042.52,5904.2 ccw(c13049.81,5910.3) 13049.58,5900.8 13074.43,5900.2 C35.2@13103.09,5900.2 ; C35.2@13103.09,5901.2 C35.2@13105.5,5900.42
  Top Layer w8: C35.2@13105.5,5900.42 U21.23@13267.53,5900.42
pads on no net: J1.6 J1.7 J1.8 J7.4 J19.8 J30.1 J30.8 SW3.2 SW3.4 SW4.MH1 SW4.MH2 U7.3 U7.7 U8.1 U10.1 U11.1 U19.8 U21.18 U21.34 U21.35 U21.38 U21.40 U21.41 U21.42 U21.43 U21.47 U21.48 U21.49 U21.50 U21.53 U21.57 U21.58 U21.63 U21.66 U21.67 U21.86 U21.90 U21.91 U21.98 U21.119 U21.122 U21.123 U21.128 U21.129 U21.132 U21.137 U22.8

## Polygon pours and split planes (outlines as drawn)
GND on Top Layer "NONET_L-01_P-001" (solid, remove dead copper, pour order 36): 9727.15,2842.78 9727.15,6917.58 cw(c9884.63,6917.58) 9884.63,7075.06 15152.35,7075.06 cw(c15152.35,6917.58) 15309.83,6917.58 15309.83,2842.78 cw(c15152.35,2842.78) 15152.35,2685.3 9884.63,2685.3 cw(c9884.63,2842.78)
5V on Top Layer "NONET_L-01_P-001" (solid, pour order 28): 14721.73,6915 14721.73,6761.12 ccw(c14738.27,6761.12) 14738.27,6744.58 14840.58,6744.58 ccw(c14840.58,6759) 14855,6759 14855,6895.63 ccw(c14835.63,6895.63) 14835.63,6915
VCC##12 on Top Layer "NONET_L-01_P-001" (solid, pour order 23): 13730,4299 14580.5,4299 14580.5,4477 13730,4477 13730,4732.05 13353.04,4732.05 13353.04,4539.78 13276.85,4539.78 13276.85,4310.56 13514.29,4310.56 13514.29,3335 13201,3335 13201,3250 13244.19,3250 13244.19,3162.63 13267.81,3162.63 13267.81,3250 13465,3250 13465,3110 13730,3110
VCC#P on Top Layer "NONET_L-01_P-001" (solid, pour order 22): 14424.41,3720 14636.14,3720 14636.14,3631.91 14942.44,3631.91 14942.44,3895 14891.83,3895 14891.83,4115.5 14424.41,4115.5
VCC#M on Top Layer "NONET_L-01_P-001" (solid, pour order 21): 14424.41,3435 14525,3435 cw(c14525,3365) 14595,3365 14595,3275 15134.82,3275 15134.82,3606.27 14952.44,3606.27 14952.44,3530 14775,3530 14775,3606.27 14615,3606.27 14615,3696.93 14424.41,3696.93
5V on Top Layer "NONET_L-01_P-001" (solid, pour order 20): 12348.79,3040 12971.55,3040 13065,3133.45 13065,3350 13100,3385 13450.08,3385 13450.08,3630 12988.55,3630 12934.02,3575.47 12934.02,3386.02 12888,3340 12348.79,3340
3V3 on Top Layer "3V3_L01_P019" (solid, pour order 19): 12843.47,3590.28 12424.72,3590.28 12404,3611 12404,3992 12975,3992 12975,3663 12902.53,3590.53 12902.53,3468.63 12843.47,3468.63
NetL7_2 on Top Layer "NETL7_2_L01_P013" (solid, pour order 13): 12346.73,4288.71 12346.73,4243.84 12372.2,4218.37 12372.2,4045.04 12454.55,4045.04 12454.55,4230.1 12395.94,4288.71
NetC115_1 on Top Layer "NETC115_1_L01_P012" (solid, pour order 12): 11558,4305 11558,3987 12329,3987 12359,4017 12359,4214.23 12336.88,4236.35 12336.88,4288.71 12327.04,4288.71 12269.19,4288.71 12199.49,4219.01 12199.49,4139.49 12166,4106 11795.59,4106 11765.35,4136.24 11765.35,4305
PGND on Top Layer "PGND_L01_P014" (solid, pour order 14): 11826,4696.35 11826,4356.13 11558,4356.13 11558,4866.47 12356.57,4866.47 12356.57,4402.88 12356.57,4375.32 12269.04,4375.32 12219.49,4424.87 12219.49,4696.35
NetC122_2 on Top Layer "NETC122_2_L01_P018" (solid, pour order 18): 12429.88,4272.49 12404.8,4297.56 12404.8,4307.41 12500.91,4307.41 12510.99,4317.49 12570.49,4317.49 12572.99,4319.99 12572.99,4374.62 12617.99,4374.62 12617.99,4272.49
3V3_MCU on Top Layer "3V3_MCU_L01_P017" (solid, pour order 17): 14220,4896.72 14220,5117.5 13945,5117.5 13945,4897 14045.72,4897 14045.99,4896.72
NetC67_2 on Top Layer "NETC67_2_L01_P016" (solid, pour order 16): 13961.13,4729.6 14053.87,4729.6 14053.87,4765.37 14053.87,4867.19 14134.78,4867.19 14134.78,4753.3 14324,4753.3 14324,4593 14108.44,4593 14108.44,4659.36 14050.81,4717 13961.13,4717
GSM_PWR on Top Layer "GSM_PWR_L01_P015" (solid, pour order 15): 13195,4310.56 13195,4769 13195,4866.47 13016,4866.47 12366.41,4866.47 12366.41,4375.32 12455,4375.32 12455,4590.51 12629.99,4590.51 12629.99,4518.01 12727.5,4518.01 12727.5,4287.49 12994,4287.49 12994,4559 13131.48,4559 13131.48,4453.7 13131.48,4310.56
5V-LED on Top Layer "5V-LED_L01_P011" (solid, pour order 11): 14604,4847 14604,4600.78 14672.97,4531.81 14672.97,4407.31 14768,4407.31 14768,4847
NetC75_1 on Top Layer "NETC75_1_L01_P010" (solid, pour order 10): 14477.81,4554.28 14525,4601.47 14525,4766 14356.5,4766 14356.5,4564.49 14444.36,4564.49 14454.19,4554.66 14454.19,4501.8 14477.81,4501.8
NetD1_1 on Top Layer "NETD1_1_L01_P009" (solid, pour order 9): 13184,3020.55 13184,2928.19 13159.81,2904 13053,2904 12962,2995 12600,2995 12600,2703 13276.81,2703 13276.81,2869.9 13231,2915.71 13231,3020.55
5V on Top Layer "5V_L01_P008" (solid, pour order 8): 11213.47,3828.53 ccw(c11248.5,3828.53) 11248.5,3793.5 11385.34,3793.5 11385.34,3662.95 11095.5,3662.95 11095.5,3937 11213.47,3937
IP+_2 on Top Layer "IP+_2_L01_P005" (solid, pour order 5): 10403.34,3497.59 10102,3497.59 10102,2703 10403.34,2703
GND_DRV_2 on Top Layer "GND_DRV_2_L01_P004" (solid, pour order 4): 10425.78,3254 10425.78,2703 11112.57,2703 11112.57,3254
IP+_1 on Top Layer "IP+_1_L01_P001" (solid, pour order 1): 11435.34,3497.59 11134,3497.59 11134,2703 11435.34,2703
GND_DRV_1 on Top Layer "GND_DRV_1_L01_P000" (solid, pour order 0): 11457.78,3254 11457.78,2703 12188.57,2703 12188.57,3254
GND on Layer 1 "NONET_L-01_P-001" (solid, remove dead copper, pour order 6): 9727.15,2842.78 9727.15,6917.58 cw(c9884.63,6917.58) 9884.63,7075.06 15152.35,7075.06 cw(c15152.35,6917.58) 15309.83,6917.58 15309.83,2842.78 cw(c15152.35,2842.78) 15152.35,2685.3 9884.63,2685.3 cw(c9884.63,2842.78)
GND on Bottom Layer "NONET_L-01_P-001" (solid, remove dead copper, pour order 35): 9727.15,2842.78 9727.15,6917.58 cw(c9884.63,6917.58) 9884.63,7075.06 15152.35,7075.06 cw(c15152.35,6917.58) 15309.83,6917.58 15309.83,2842.78 cw(c15152.35,2842.78) 15152.35,2685.3 9884.63,2685.3 cw(c9884.63,2842.78)
5V-LED on Bottom Layer "NONET_L-01_P-001" (solid, pour order 34): 11720,5085 13655,5085 13655,4610 14780,4610 14780,4070 11720,4070
5V on Bottom Layer "NONET_L-01_P-001" (solid, pour order 27): 13668,4625 14795,4625 14795,4295 15142,4295 15142,5080 13668,5080
3V3 on Bottom Layer "NONET_L-01_P-001" (solid, pour order 31): 14195,5551 14705,5551 14705,6580 12490,6580 12490,5612.38 10670,5612.38 10670,6040 12045,6040 12045,7075.06 15209.83,7075.06 cw(c15209.83,6975.07) 15309.83,6975.06 15309.83,5145 14195,5145
VCC#P on Bottom Layer "NONET_L-01_P-001" (solid, pour order 24): 14834,4046.14 10285,4046.14 10285,2685.3 14834,2685.3
5V-LED on Layer 2 "NONET_L-01_P-001" (solid, pour order 32): 12240,7075.06 12240,4980 11500,4980 11500,7075.06
3V3 on Layer 2 "NONET_L-01_P-001" (solid, pour order 30): 14205,4010 14205,5785 14665,5785 14665,3245 11425,3245 11425,4010
3V3_MCU on Layer 2 "NONET_L-01_P-001" (solid, pour order 29): 14665,5830 14155,5830 14155,4980 12275,4980 12275,7075.06 14665,7075.06
GSM_PWR on Layer 2 "NONET_L-01_P-001" (solid, pour order 25): 9727.15,7075.06 11465,7075.06 11465,4947 14155,4947 14155,4050 9727.15,4050
5V on Layer 2 "NONET_L-01_P-001" (solid, pour order 26): 15309.83,3206 15309.83,6917.58 ccw(c15152.35,6917.58) 15152.35,7075.06 14703,7075.06 14703,3206 11392,3206 11392,4010 9727.15,4010 9727.15,2842.78 ccw(c9884.63,2842.78) 9884.63,2685.3 15087.09,2685.3 15152.35,2685.3 ccw(c15152.35,2842.78) 15309.83,2842.78 15309.83,2945.65

## Other copper
Top Layer:
  rectangle net GSM_PWR: 9865.01,5288.15 10067.84,5319.64
  rectangle net GSM_PWR: 9865.01,5288.15 9928.79,5368.86
  rectangle net GND: 11845,4520 11978,4684.37
  region net NetLED1_2: 13830.67,5302.6 13749.31,5302.6 13749.31,5257.6 13830.67,5257.6
  rectangle net NetLED2_2: 13643.33,5257.6 13724.69,5302.6
  rectangle net NetLED3_2: 13534.83,5258.3 13616.19,5303.3
  rectangle net VCC##12: 14454.19,4407.31 14580.5,4446.69
  rectangle net VDDA: 13239.76,5703.57 13295.23,5723.25
  rectangle net NetC69_2: 9872.45,4483.11 9923.8,4532.32
  rectangle net 3V3_MCU: 12299.5,6361.26 12343.54,6440
  rectangle net ADDR-LED: 12236.46,6361.26 12280.5,6440
  rectangle net VCC#12: 13775,3720 13986.73,3944.65
  rectangle net VCC#12: 13775,3720 14286.9,3820.78
  rectangle net SHDN: 15061.96,3638.59 15096.96,3715.64
  rectangle net VSS: 14955.75,3809.25 15256.23,3895
  rectangle net NetD6_1: 15161.74,3430 15256.23,3654.3
  rectangle net GATE: 14788.11,3545.39 14942.44,3606.27
  rectangle net BAT: 13775,2703 14231.5,3696.93
  rectangle net PGND: 11785,4575 11826,4715
  rectangle net NetC122_2: 12418.58,4287.19 12617.99,4307.49
  rectangle net NetC115_1: 12267.67,4262.53 12336.73,4288.71
  rectangle net GSM_PWR: 12366.61,4375.48 12455,4402.88
  rectangle net PGND: 12269.04,4375.32 12356.57,4402.88
  rectangle net GSM_PWR: 12290.63,4339.77 12318.19,4361.54
  rectangle net NetC67_2: 13961.13,4718.12 14112.1,4728.58
  rectangle net GSM_PWR: 13083,4763 13826.25,4866.47
  rectangle net GND: 11845,4606.88 11863,4684.37
  rectangle net "IPK SNS": 13124,3162.63 13217.81,3223.66
  rectangle net "IPK SNS": 13124,2950.03 13171,3302.5
  rectangle net VCC#P: 11457.78,3446.41 11666,3599.27
  rectangle net VIOUT1: 11404.06,3797 11558.06,3827
  rectangle net 5V: 10026,3662.95 10353.34,3789.49
  rectangle net VIOUT2: 10372.06,3797 10526.06,3827
  rectangle net VCC#P: 10425.78,3446.41 10634,3599.27
  rectangle net GND_DRV_2: 10425.78,2808 10515.28,3430
  rectangle net GND_DRV_1: 11457.78,2808 11547.28,3430
Bottom Layer:
  text "GTV4.0-V16-LITE" at 11881.98,2750.23 h90
Multi-Layer:
  pour cut-out: 9924,2911.68 cw(c9924,3079) 9756.68,3079 cw(c9924,3079) 9924,3246.32 cw(c9924,3079) 10091.32,3079 cw(c9924,3079)
  pour cut-out: 15112.98,2911.68 ccw(c15112.98,3079) 15280.3,3079 ccw(c15112.98,3079) 15112.98,3246.32 ccw(c15112.98,3079) 14945.65,3079 ccw(c15112.98,3079)
  pour cut-out: 15112.98,6514.04 ccw(c15112.98,6681.36) 15280.3,6681.36 ccw(c15112.98,6681.36) 15112.98,6848.69 ccw(c15112.98,6681.36) 14945.65,6681.36 ccw(c15112.98,6681.36)
  pour cut-out: 9924,6514.04 cw(c9924,6681.36) 9756.68,6681.36 cw(c9924,6681.36) 9924,6848.69 cw(c9924,6681.36) 10091.32,6681.36 cw(c9924,6681.36)

## Silkscreen, mask and mechanical layers (free items; w line width, h text height)
Top Overlay:
  circle w10: c9924,6681.36 r167.32
  circle w10: c9924,3079 r167.32
  circle w10: c15112.98,3079 r167.32
  circle w10: c15112.98,6681.36 r167.32
  lines w10: 10911.35,5746.35 10911.35,5830 ; 10557.27,5041.35 11267.27,5041.35 11267.27,5746.35 10557.27,5746.35 10557.27,5041.35 ; 10560,5830 11270,5830 11270,6415 10560,6415 10560,5830
  text "DEBUG" at 14123,6711.09 h70.87
  text "GND     PSW      5V     PWR" at 11140,6517.92 h70.87 r180
  text "GND  HEATER" at 11726,6517.95 h70.87 r180
  text "GND     DIN      5V" at 12485,6517.95 h70.87 r180
  text "BOOT" at 15272.56,6266.03 h70.87 r90
  text "TEMP-SNS" at 11851.58,5973.59 h70.87
  text "W.LED" at 12199.57,5973.59 h70.87
  text "RESET" at 15272.56,5822.46 h70.87 r90
  text "SD   CARD" at 15272.56,5047.02 h70.87 r90
  text "3V3-MCU" at 13759.88,4966.63 h39.37
  text "5V-LED" at 14753.67,4889.12 h39.37
  text "GSM-PWR" at 12123.9,4870.25 h39.37
  text "GSM-PWR" at 12941.14,4815.42 h39.37
  text "VA" at 15183.55,4297.36 h70.87 r90
  text "*" at 12257.75,4255.68 h40
  text "VB" at 15183.55,4186.57 h70.87 r90
  text "*" at 12092.1,4023.06 h40
  text "3V3" at 12350,3660.49 h39.37
  text "GND" at 12350,3466.69 h39.37
  text "GND" at 14418.4,3446.36 h70.87
  text "BAT" at 13863.47,3445.45 h70.87
  text "5V" at 13262.18,3407.18 h39.37
  text "IP2      GND" at 10194,3243.38 h70.87
  text "IP1      GND" at 11264.56,3243.38 h70.87
Board Outline:
  the board outline again, w10
Fabrication:
  drawing of 295 lines, arcs and shapes, not listed
  text "Layer" at 15227.34,9953 h60
  text "Name" at 15637.26,9953 h60
  text "Material" at 16567,9953 h60
  text "Thickness" at 17426.77,9953 h60
  text "Constant" at 18076.6,9953 h60
  text "Board Layer Stack" at 18646.46,9953 h60
  text "Top Overlay" at 15637.26,9833 h60
  text "Top Solder" at 15637.26,9713 h60
  text "Solder Resist" at 16567,9713 h60
  text "0.010mm" at 17426.77,9713 h60
  text "3.5" at 18076.6,9713 h60
  text "1" at 15227.34,9593 h60
  text "Top Layer" at 15637.26,9593 h60
  text "0.035mm" at 17426.77,9593 h60
  text "Dielectric 2" at 15637.26,9473 h60
  text "PP-006" at 16567,9473 h60
  text "0.210mm" at 17426.77,9473 h60
  text "4.4" at 18076.6,9473 h60
  text "2" at 15227.34,9353 h60
  text "Layer 1" at 15637.26,9353 h60
  text "CF-004" at 16567,9353 h60
  text "0.018mm" at 17426.77,9353 h60
  text "Dielectric 1" at 15637.26,9233 h60
  text "FR-4" at 16567,9233 h60
  text "1.065mm" at 17426.77,9233 h60
  text "4.6" at 18076.6,9233 h60
  text "3" at 15227.34,9113 h60
  text "Layer 2" at 15637.26,9113 h60
  text "CF-004" at 16567,9113 h60
  text "0.018mm" at 17426.77,9113 h60
  text "Dielectric 3" at 15637.26,8993 h60
  text "PP-006" at 16567,8993 h60
  text "0.210mm" at 17426.77,8993 h60
  text "4.4" at 18076.6,8993 h60
  text "4" at 15227.34,8873 h60
  text "Bottom Layer" at 15637.26,8873 h60
  text "0.035mm" at 17426.77,8873 h60
  text "Bottom Solder" at 15637.26,8753 h60
  text "Solder Resist" at 16567,8753 h60
  text "0.010mm" at 17426.77,8753 h60
  text "3.5" at 18076.6,8753 h60
  text "Bottom Overlay" at 15637.26,8633 h60
  text "Total board thickness:" at 15227.34,8513 h60
  text "1.611mm" at 17426.77,8513 h60
Drill Drawing:
  drawing of 159 lines, arcs and shapes, not listed
  text "Symbol" at 1045.5,10484.94 h72
  text "Count" at 1551.38,10484.94 h72
  text "Hole Size" at 2141.22,10484.94 h72
  text "Plated" at 3290.88,10484.94 h72
  text "Hole Type" at 3796.76,10484.94 h72
  text "Drill Layer Pair" at 4530.56,10484.94 h72
  text "Via/Pad" at 6030.11,10484.94 h72
  text "Pad Shape" at 6619.96,10484.94 h72
  text "Template" at 7365.76,10484.94 h72
  text "Description" at 8595.4,10484.94 h72
  text "Hole Tolerance (+)" at 9449.16,10484.94 h72
  text "Hole Tolerance (-)" at 10782.77,10484.94 h72
  text "Hole Length" at 12116.38,10484.94 h72
  text "Routed Path Length" at 13216.06,10484.94 h72
  text "2" at 1551.38,10334.94 h60
  text "0.500mm (19.69mil)" at 2141.22,10334.94 h60
  text "PTH" at 3290.88,10334.94 h60
  text "Slot" at 3796.76,10334.94 h60
  text "Top Layer - Bottom Layer" at 4530.56,10334.94 h60
  text "Pad" at 6030.11,10334.94 h60
  text "Rounded" at 6619.96,10334.94 h60
  text "r80_155h50_115r40" at 7365.76,10334.94 h60
  text "1.150mm (45.28mil)" at 12116.38,10334.94 h60
  text "0.650mm (25.59mil)" at 13216.06,10334.94 h60
  text "2" at 1551.38,10184.94 h60
  text "0.550mm (21.65mil)" at 2141.22,10184.94 h60
  text "PTH" at 3290.88,10184.94 h60
  text "Slot" at 3796.76,10184.94 h60
  text "Top Layer - Bottom Layer" at 4530.56,10184.94 h60
  text "Pad" at 6030.11,10184.94 h60
  text "Rounded" at 6619.96,10184.94 h60
  text "r100_125h55_85r50" at 7365.76,10184.94 h60
  text "0.850mm (33.47mil)" at 12116.38,10184.94 h60
  text "0.300mm (11.81mil)" at 13216.06,10184.94 h60
  text "2" at 1551.38,10034.94 h60
  text "0.700mm (27.56mil)" at 2141.22,10034.94 h60
  text "PTH" at 3290.88,10034.94 h60
  text "Rectangle" at 3796.76,10034.94 h60
  text "Top Layer - Bottom Layer" at 4530.56,10034.94 h60
  text "Pad" at 6030.11,10034.94 h60
  text "Rectangle" at 6619.96,10034.94 h60
  text "(Mixed)" at 7365.76,10034.94 h60
  text "1.500mm (59.06mil)" at 12116.38,10034.94 h60
  text "1.500mm (59.06mil)" at 13216.06,10034.94 h60
  text "2" at 1551.38,9884.94 h60
  text "0.920mm (36.22mil)" at 2141.22,9884.94 h60
  text "PTH" at 3290.88,9884.94 h60
  text "Round" at 3796.76,9884.94 h60
  text "Top Layer - Bottom Layer" at 4530.56,9884.94 h60
  text "Pad" at 6030.11,9884.94 h60
  text "(Mixed)" at 6619.96,9884.94 h60
  text "(Mixed)" at 7365.76,9884.94 h60
  text "-" at 12116.38,9884.94 h60
  text "-" at 13216.06,9884.94 h60
  text "3" at 1551.38,9734.94 h60
  text "0.914mm (36.00mil)" at 2141.22,9734.94 h60
  text "PTH" at 3290.88,9734.94 h60
  text "Round" at 3796.76,9734.94 h60
  text "Top Layer - Bottom Layer" at 4530.56,9734.94 h60
  text "Pad" at 6030.11,9734.94 h60
  text "Rounded" at 6619.96,9734.94 h60
  text "c152h91m163mx163p0" at 7365.76,9734.94 h60
  text "-" at 12116.38,9734.94 h60
  text "-" at 13216.06,9734.94 h60
  text "A" at 1016.41,9724.95 h66.67
  text "3" at 1551.38,9584.94 h60
  text "1.000mm (39.37mil)" at 2141.22,9584.94 h60
  text "PTH" at 3290.88,9584.94 h60
  text "Round" at 3796.76,9584.94 h60
  text "Top Layer - Bottom Layer" at 4530.56,9584.94 h60
  text "Pad" at 6030.11,9584.94 h60
  text "(Mixed)" at 6619.96,9584.94 h60
  text "(Mixed)" at 7365.76,9584.94 h60
  text "-" at 12116.38,9584.94 h60
  text "-" at 13216.06,9584.94 h60
  text "4" at 1551.38,9434.94 h60
  text "0.750mm (29.53mil)" at 2141.22,9434.94 h60
  text "PTH" at 3290.88,9434.94 h60
  text "Round" at 3796.76,9434.94 h60
  text "Top Layer - Bottom Layer" at 4530.56,9434.94 h60
  text "Pad" at 6030.11,9434.94 h60
  text "(Mixed)" at 6619.96,9434.94 h60
  text "(Mixed)" at 7365.76,9434.94 h60
  text "-" at 12116.38,9434.94 h60
  text "-" at 13216.06,9434.94 h60
  text "4" at 1551.38,9284.94 h60
  text "2.400mm (94.49mil)" at 2141.22,9284.94 h60
  text "PTH" at 3290.88,9284.94 h60
  text "Round" at 3796.76,9284.94 h60
  text "Top Layer - Bottom Layer" at 4530.56,9284.94 h60
  text "Pad" at 6030.11,9284.94 h60
  text "Rounded" at 6619.96,9284.94 h60
  text "c360h240m370mx370p0" at 7365.76,9284.94 h60
  text "-" at 12116.38,9284.94 h60
  text "-" at 13216.06,9284.94 h60
  text "4" at 1551.38,9134.94 h60
  text "5.100mm (200.79mil)" at 2141.22,9134.94 h60
  text "NPTH" at 3290.88,9134.94 h60
  text "Round" at 3796.76,9134.94 h60
  text "Top Layer - Bottom Layer" at 4530.56,9134.94 h60
  text "Pad" at 6030.11,9134.94 h60
  text "Rounded" at 6619.96,9134.94 h60
  text "c0hn510" at 7365.76,9134.94 h60
  text "-" at 12116.38,9134.94 h60
  text "-" at 13216.06,9134.94 h60
  text "5" at 1551.38,8984.94 h60
  text "1.200mm (47.24mil)" at 2141.22,8984.94 h60
  text "PTH" at 3290.88,8984.94 h60
  text "Round" at 3796.76,8984.94 h60
  text "Top Layer - Bottom Layer" at 4530.56,8984.94 h60
  text "Pad" at 6030.11,8984.94 h60
  text "(Mixed)" at 6619.96,8984.94 h60
  text "(Mixed)" at 7365.76,8984.94 h60
  text "-" at 12116.38,8984.94 h60
  text "-" at 13216.06,8984.94 h60
  text "13" at 1551.38,8834.94 h60
  text "1.600mm (62.99mil)" at 2141.22,8834.94 h60
  text "PTH" at 3290.88,8834.94 h60
  text "Round" at 3796.76,8834.94 h60
  text "Top Layer - Bottom Layer" at 4530.56,8834.94 h60
  text "Pad" at 6030.11,8834.94 h60
  text "Rounded" at 6619.96,8834.94 h60
  text "(Mixed)" at 7365.76,8834.94 h60
  text "-" at 12116.38,8834.94 h60
  text "-" at 13216.06,8834.94 h60
  text "375" at 1551.38,8684.94 h60
  text "0.300mm (11.81mil)" at 2141.22,8684.94 h60
  text "PTH" at 3290.88,8684.94 h60
  text "Round" at 3796.76,8684.94 h60
  text "Top Layer - Bottom Layer" at 4530.56,8684.94 h60
  text "Via" at 6030.11,8684.94 h60
  text "Rounded" at 6619.96,8684.94 h60
  text "v60h30m0mx0" at 7365.76,8684.94 h60
  text "-" at 12116.38,8684.94 h60
  text "-" at 13216.06,8684.94 h60
  text "419 Total" at 1551.38,8534.94 h60
  text "Slot definitions :" at 1045.5,8389.97 h60
  text "Routed Path Length" at 2078.19,8389.97 h60
  text "= Calculated from tool start centre position to tool end centre position." at 3180.86,8389.97 h60
  text "Hole Length" at 2078.19,8289.99 h60
  text "= Routed Path Length + Tool Size = Slot length as defined in the PCB layout" at 2770.99,8289.99 h60

## Dimensions
9727.15,6917.58 to 15309.83,6917.58 on Dimension
15152.35,7075.06 to 15152.35,2685.3 on Dimension